# Altium PCB PCB_Smart-Watch-v1.0.PcbDoc (part 1 of 2)
Units mil, origin at the board's own origin, x right, y up, seen from the top; angles counter-clockwise.
Board outline 1007.4 x 787.4 mil, 4 copper layers (Top Layer, Layer 1, Layer 2, Bottom Layer), stack 62.449 mil thick; 64 components, 42 nets, 320 pads, 89 vias.
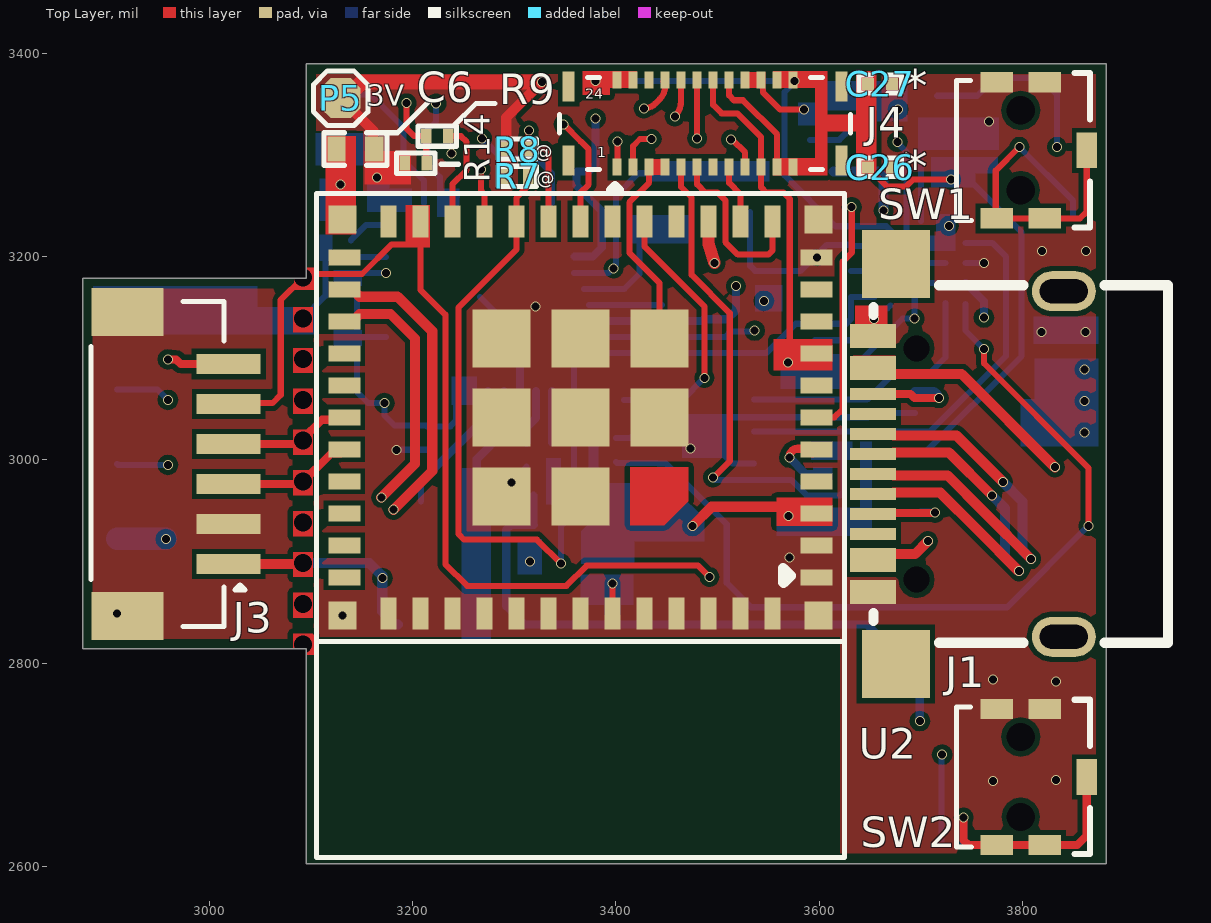
[diagram p0: Top Layer view]
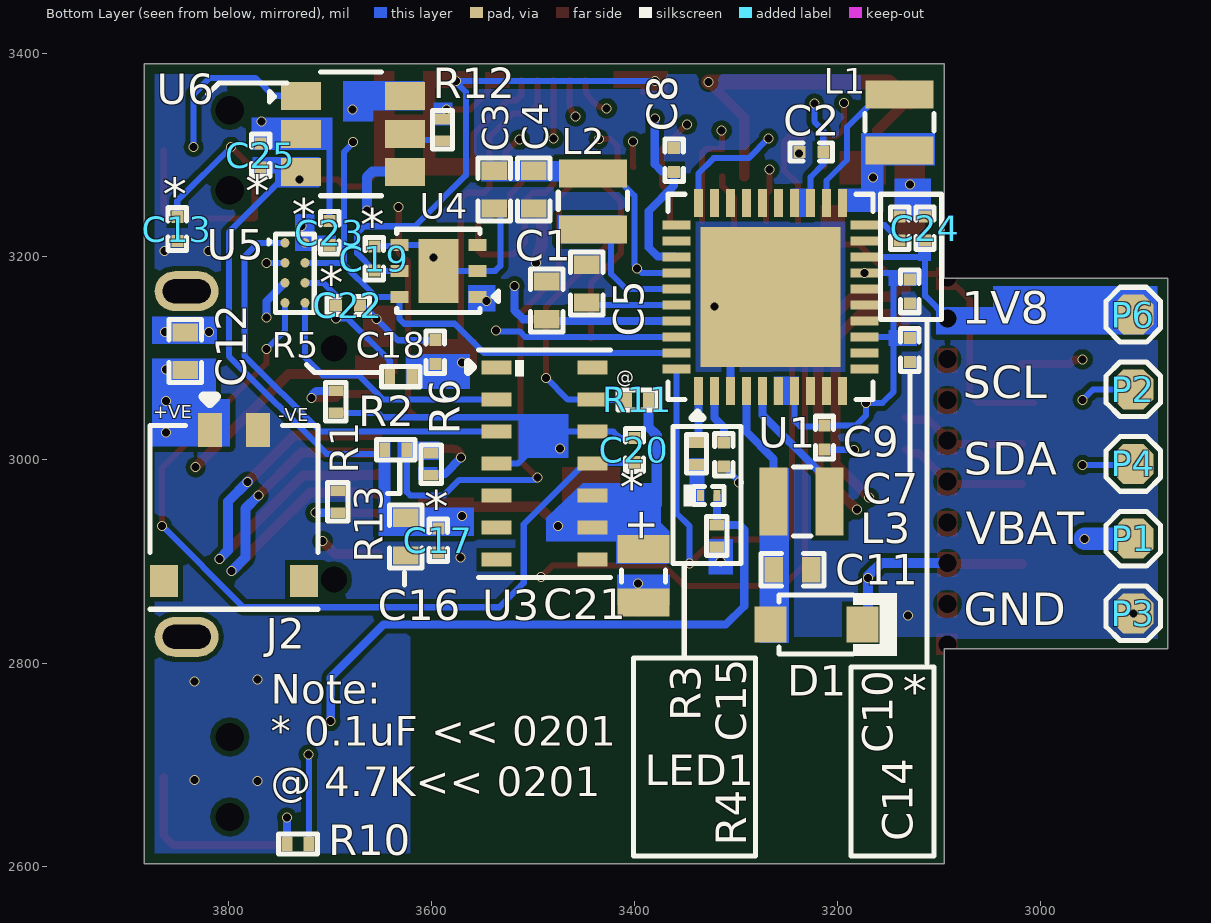
[diagram p1: Bottom Layer view, seen from below]
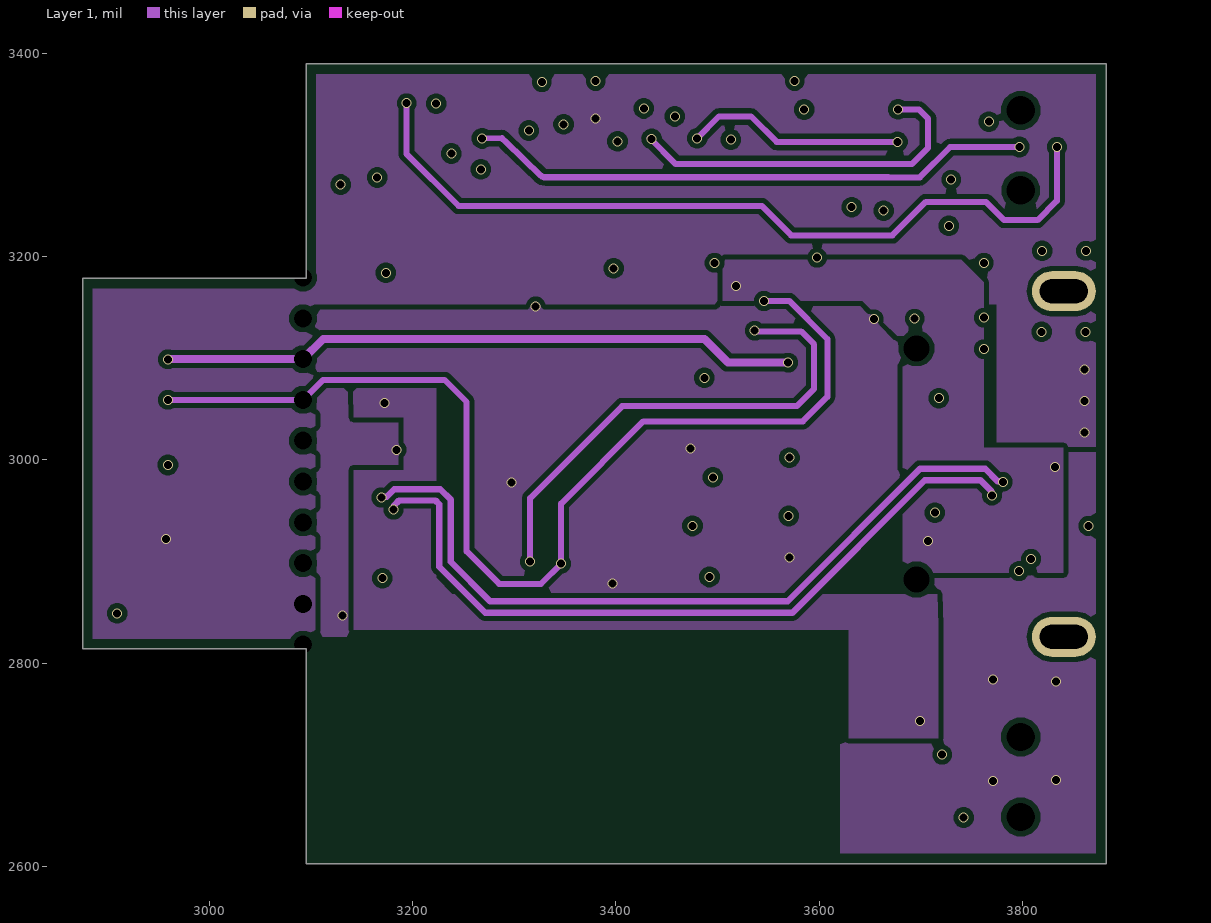
[diagram p2: Layer 1]
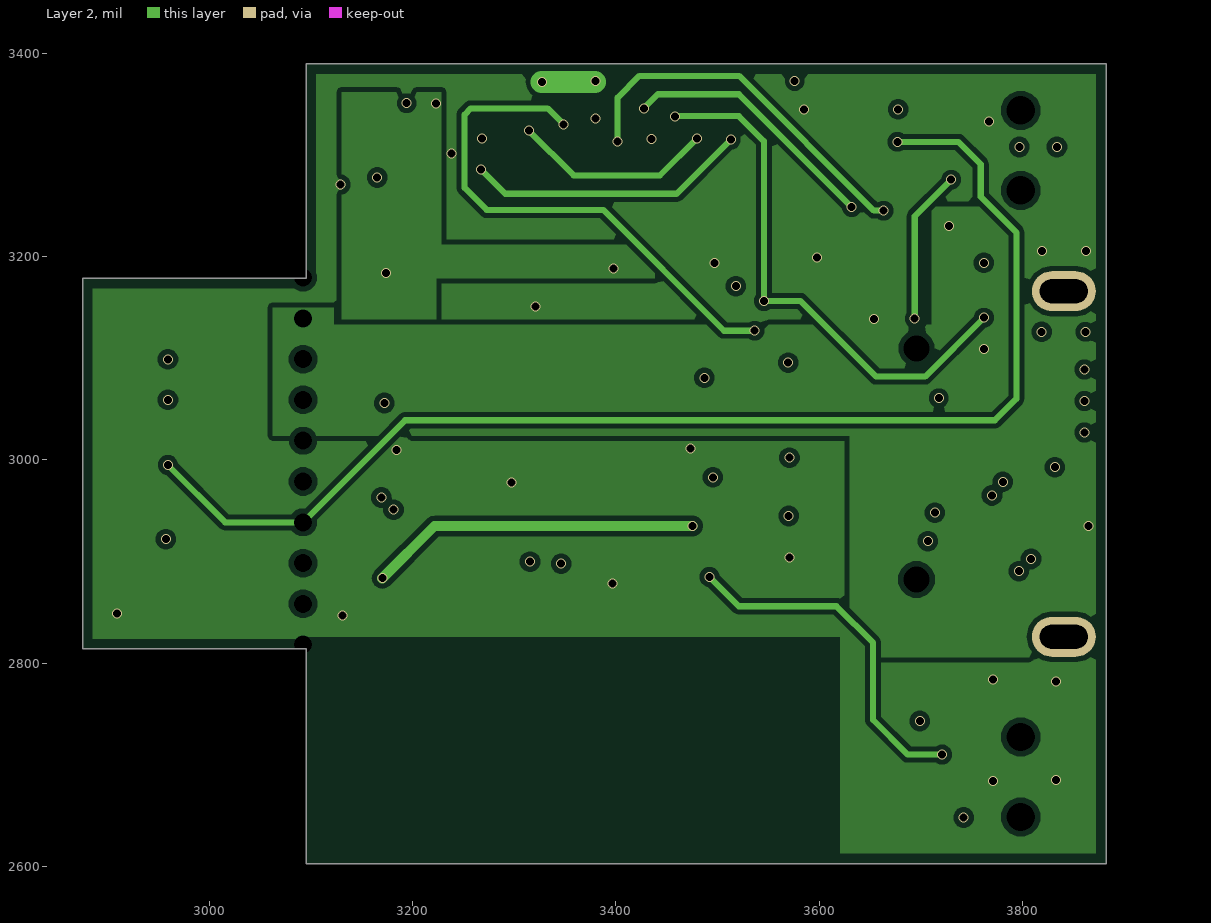
[diagram p3: Layer 2]
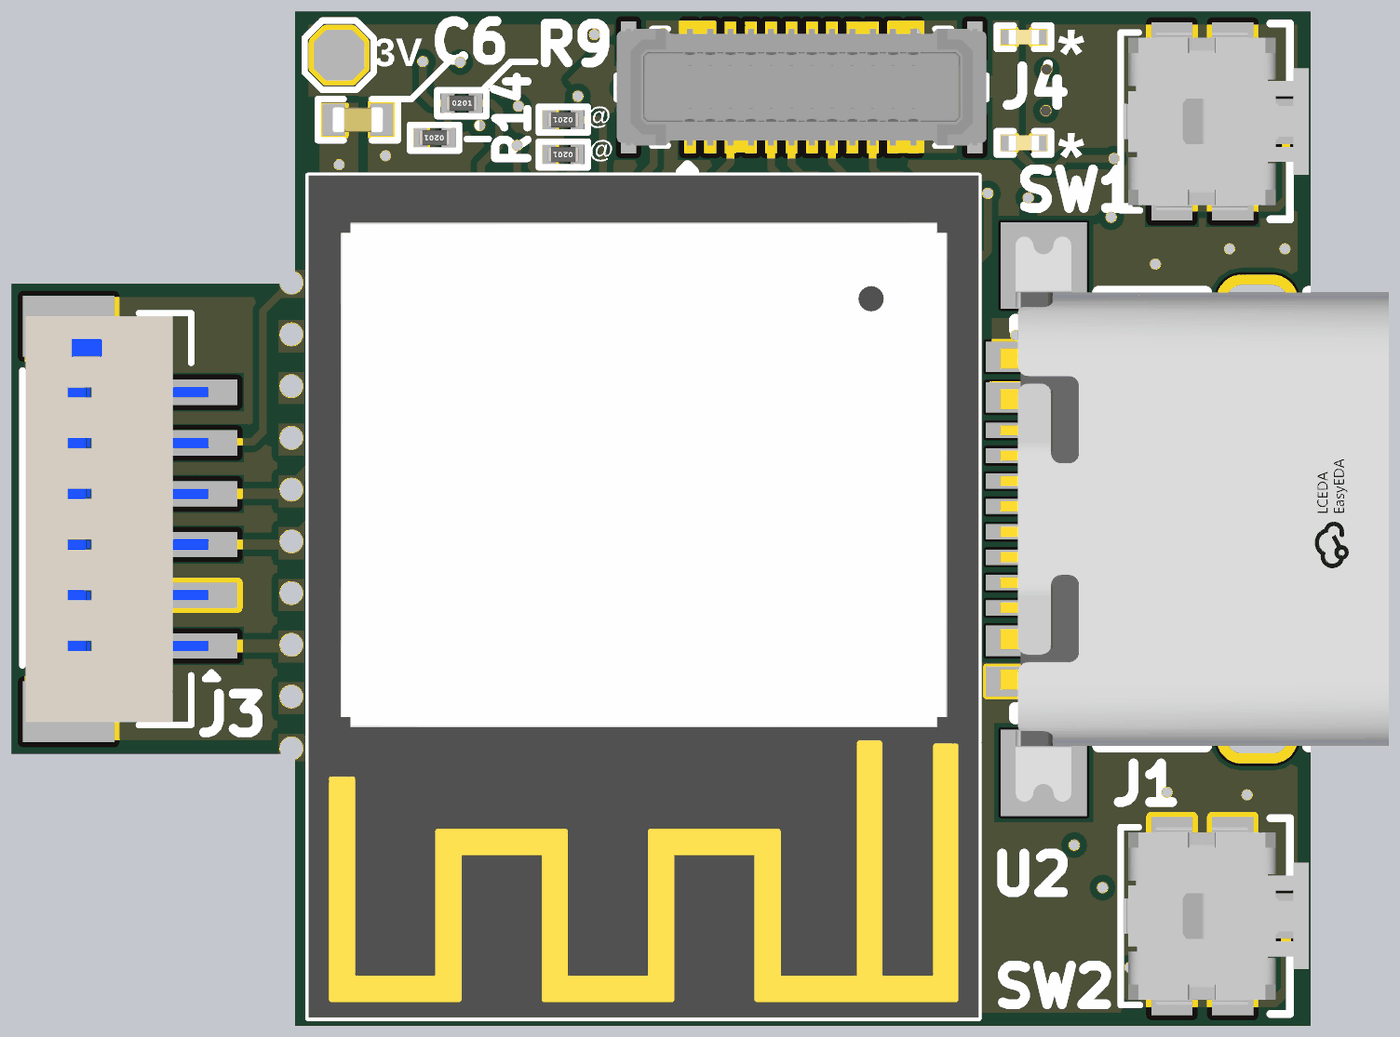
[diagram p5: 3D render of the assembled board from above, using the file's embedded part models]
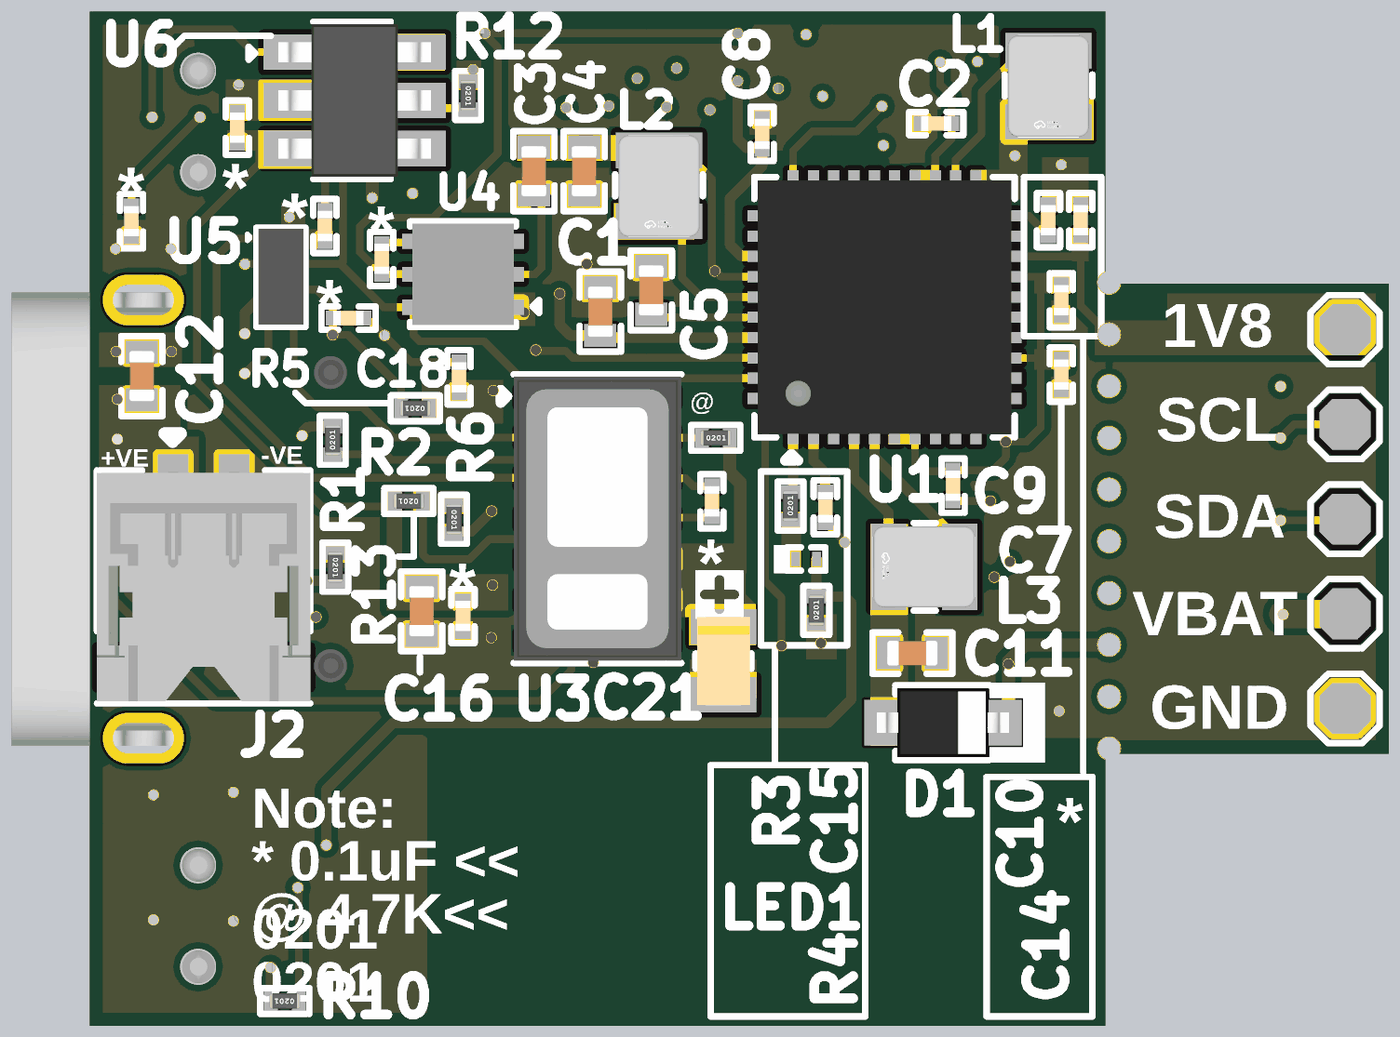
[diagram p6: 3D render of the assembled board from below, using the file's embedded part models]

## Layer stack, top to bottom
Top Solder: solder mask 0.3937, Solder Resist, Dk 3.5
Top Layer: signal copper 1.378
Dielectric 2: prepreg 8.2835, PP-006, Dk 4.1
Layer 1: signal copper 0.5984
Dielectric 1: core 41.9291, FR-4, Dk 4.8
Layer 2: signal copper 0.5984
Dielectric 3: prepreg 8.2835, PP-006, Dk 4.1
Bottom Layer: signal copper 1.378
Bottom Solder: solder mask 0.3937, Solder Resist, Dk 3.5

## Board outline
2875,2814 2875,3178.6 3095,3178.6 3095,3390 3882.4,3390 3882.4,2602.6 3095,2602.6 3095,2814

## Design rules (kind name [scope] priority, off if disabled: settings)
BoardOutlineClearance [All] p1: gap=0 ignorepadtopadclearanceinfootprint=FALSE except(10: Poly-OutlineEdge)
Clearance [All] p1: gap=5 ignorepadtopadclearanceinfootprint=FALSE except(4: Arc-SMDPad Track-SMDPad SMDPad-SMDPad)
DiffPairsRouting [All] p1: maxlimit=7 minlimit=5 mostfreqgap=7 toplayer_mingap=7 toplayer_minwidth=10 toplayer_maxwidth=10 toplayer_prefwidth=10 midlayer1_maxgap=5 midlayer1_prefgap=5 midlayer1_minwidth=6.27 midlayer1_maxwidth=6.27 midlayer1_prefwidth=6.27 midlayer2_maxgap=5 midlayer2_prefgap=5 midlayer2_minwidth=6.27 midlayer2_maxwidth=6.27 midlayer2_prefwidth=6.27 bottomlayer_mingap=7 bottomlayer_minwidth=10 bottomlayer_maxwidth=10 bottomlayer_prefwidth=10 impedanceprofiledriven=TRUE impedanceprofileid={1438CEE1-A6E1-463A-A099-11A46FD6A5DC} impedanceprofilevalue=90.000000 maxuncoupledlength=500
HoleToHoleClearance [All] p1: gap=0 allowstackedmicrovias=TRUE
MatchedLengths "Schematic Matched Net Lengths" [InNetClass('USB_DIFF')] p1: tolerance=20 checknetsindiffpair=TRUE checkdiffpairvsdiffpair=FALSE checkxsignals=FALSE checkothers=FALSE
MaxMinImpedance "Schematic Impedance Constraint" [InNetClass('USB_DIFF')] p1: minimum=85.00 maximum=95.00
MinimumSolderMaskSliver [All] p1: minsoldermaskwidth=0
PolygonConnect [All] p1: connectstyle=Direct reliefconductorwidth=10 reliefentries=4 polygonreliefangle="90 Angle" airgapwidth=10
RoutingVias [All] p1: holewidth=7.87 width=9.84 viastyle="Through Hole" minholewidth=7.87 minwidth=9.84 maxholewidth=7.87 maxwidth=9.84
SilkToSilkClearance [All] p1: silktosilkclearance=0
SilkToSolderMaskClearance [IsPad] p1: minsilkscreentomaskgap=0 clearancetoexposedcopper=TRUE
SolderMaskExpansion SolderMaskExpansion_1 [All] p1: expansion=4 istentingtop=FALSE
Width [All] p1: maxlimit=100 minlimit=6 preferedwidth=22
25 further rules are at their usual default settings.

## Classes and differential pairs
differential pair class USB_DIFF_Lines: USB
net class USB_DIFF: USB_N USB_P
component class U_Sensor-Sheet: C19 C20 C21 C22 C23 R11 U3 U4 U5
component class U_Power-Sheet: C1 C2 C3 C4 C5 C6 C7 C8 C9 C10 C11 C12 C13 C14 C15 C24 D1 J1 J2 L1 L2 L3 LED1 P1 P2 P3 P4 P5 P6 R1 R2 R3 R4 SW1 U1
component class U_Display-Sheet: C25 C26 C27 J4 R12 U6
component class U_Controller-Sheet: C16 C17 C18 J3 R5 R6 R7 R8 R9 R10 R13 R14 SW2 U2
differential pair USB: +USB_P -USB_N

## Components (designator, comment, footprint, x,y, rotation, side; value= is the part's Value field where it differs from the comment)
C1 "10uF" Cap-0402 3486.5,3157 r270 bottom locked
C2 "2.2uF" CAP-0201 3226,3303 r0 bottom locked
C3 "22uF" Cap-0402 3538,3266 r90 bottom locked
C4 "22uF" Cap-0402 3499,3266 r90 bottom locked
C5 "10uF" Cap-0402 3447,3173.5 r90 bottom locked
C6 "22uF" Cap-0402 3143.5,3306 r0 top locked
C7 "2.2uF" CAP-0201 3129,3108.19 r90 bottom locked
C8 "1uF" CAP-0201 3361,3295 r270 bottom locked
C9 "2.2uF" CAP-0201 3213,3022 r270 bottom locked
C10 "2.2uF" CAP-0201 3139,3228 r270 bottom locked
C11 "22uF" Cap-0402 3244.5,2892 r0 bottom locked
C12 "10uF" Cap-0402 3842,3107 r90 bottom locked
C13 "100nF" CAP-0201 3850,3227.19 r270 bottom
C14 "1uF" CAP-0201 3129,3165.81 r90 bottom locked
C15 "2.2uF" CAP-0201 3312,3005.19 r270 bottom locked
C16 "10uF" Cap-0402 3625,2924.5 r90 bottom locked
C17 "100nF" CAP-0201 3593,2920.81 r90 bottom locked
C18 "1uF" CAP-0201 3596,3106 r270 bottom locked
C19 "100nF" CAP-0201 3656,3198 r90 bottom
C20 "100nF" CAP-0201 3400,3009.81 r270 bottom locked
C21 "10uF" Tant-0603 3391,2886 r270 bottom locked
C22 "100nF" CAP-0201 3681.81,3152 r180 bottom locked
C23 "100nF" CAP-0201 3700.01,3223.5 r270 bottom locked
C24 "100nF" CAP-0201 3114,3228 r270 bottom locked
C25 "100nF" CAP-0201 3768,3299.81 r270 bottom locked
C26 "100nF" CAP-0201 3660,3288 r180 top locked
C27 "100nF" CAP-0201 3660,3370 r180 top locked
D1 "B5819WS" SOD-323 3220.72,2838 r0 bottom locked
J1 "TYPEC-312DSS-ACP16" TYPEC-312DSS-ACP16 3747,2996 r90 top locked
J2 "0781710002" 0781710002 3794.1,2955.31 r180 bottom locked
J3 "Voltlink Target" "Voltlink Target" 2969,2996 r90 top locked
J4 "BM20B(0.8)-24DS-0.4V(51)" BM20B(0.8)-24DS-0.4V(51) 3487.63,3331.09 r0 top locked
L1 "1uH" WPN201610M1R0MT 3139,3332 r270 bottom locked
L2 "1uH" WPN201610M1R0MT 3441,3254.56 r270 bottom locked
L3 "1uH" WPN201610M1R0MT 3235.44,2959 r0 bottom locked
LED1 "RED" LED-0201 3326.93,2965 r0 bottom locked
P1 "TEST POINT 0.5mm Dia" "Test-point - 0.5mm" 2909,2922.5 r90 bottom locked
P2 "TEST POINT 0.5mm Dia" "Test-point - 0.5mm" 2909,3069.5 r90 bottom locked
P3 "TEST POINT 0.5mm Dia" "Test-point - 0.5mm" 2909,2849 r90 bottom locked
P4 "TEST POINT 0.5mm Dia" "Test-point - 0.5mm" 2909,2996 r90 bottom locked
P5 "TEST POINT 0.5mm Dia" "Test-point - 0.5mm" 3129,3356 r90 top locked
P6 "TEST POINT 0.5mm Dia" "Test-point - 0.5mm" 2909,3143 r90 bottom locked
R1 "5.1K" Res-0201 3692,2958.83 r270 bottom locked value=5.1kR
R2 "5.1K" Res-0201 3694,3057.17 r90 bottom locked value=5.1kR
R3 "220R" Res-0201 3339,3006.17 r90 bottom locked
R4 "10K" Res-0201 3319,2925.17 r90 bottom locked
R5 "10K" Res-0201 3630,3082 r0 bottom locked
R6 "0R" Res-0201 3600,2995.83 r270 bottom locked
R7 "4.7K" Res-0201 3302.83,3279 r180 top locked
R8 "4.7K" Res-0201 3302.83,3306 r180 top locked
R9 "0R" Res-0201 3224.08,3318.75 r0 top locked
R10 "0R" Res-0201 3731.17,2622 r0 bottom locked
R11 "4.7K" Res-0201 3397,3059 r180 bottom locked
R12 "10K" Res-0201 3589,3324.83 r270 bottom locked
R13 "10K" Res-0201 3635,3010 r0 bottom locked
R14 "10K" Res-0201 3203,3292 r180 top locked
SW1 "R-667799" R-667799 3819.05,3304.63 r270 top locked
SW2 "R-667799" R-667799 3819.05,2687.93 r270 top locked
U1 "AXP2101" "40-QFN (5mm×5mm)" 3266.12,3160.48 r90 bottom locked
U2 "ESP32-C3-MINI-1-H4" ESP32-C3-MINI-1-H4 3364.98,3041.91 r180 top locked
U3 "MAX30102EFD+T" MAX30102EFD+T 3488.7,2996.3 r180 bottom locked
U4 "TMP117AIDRVT" WSON-6(2x2) 3593,3186 r0 bottom locked
U5 "TXS0102YZPR" 8-DSBGA 3734.16,3184.16 r180 bottom locked
U6 "FAN5622SX" SuperSOT-6 3677,3321 r180 bottom locked

## Footprints (in the part's own frame and the unit in brackets; to place one, negate y for a bottom-side part, rotate by r counter-clockwise, add the part's x,y. Pads: shape width x height; smd on the part's side, far side on the other; paste and mask are expansions set on the pad)
8-DSBGA [mm]
  round 0.23 smd mask+0.05: A1(-0.25,0.75) A2(0.25,0.75) B1(-0.25,0.25) B2(0.25,0.25) C1(-0.25,-0.25) C2(0.25,-0.25) D1(-0.25,-0.75) D2(0.25,-0.75)
  silkscreen extent -0.66,-0.99 0.48,0.97, body extent -0.44,-0.94 0.44,0.94, height 0.5
"40-QFN (5mm×5mm)" [mm]
  rect 0.7x0.22 smd: 1(-2.35,1.8) 2(-2.35,1.4) 3(-2.35,1) 4(-2.35,0.6) 5(-2.35,0.2) 6(-2.35,-0.2) 7(-2.35,-0.6) 8(-2.35,-1) 9(-2.35,-1.4) 10(-2.35,-1.8) 21(2.35,-1.8) 22(2.35,-1.4) 23(2.35,-1) 24(2.35,-0.6) 25(2.35,-0.2) 26(2.35,0.2) 27(2.35,0.6) 28(2.35,1) 29(2.35,1.4) 30(2.35,1.8)
  rect 0.22x0.7 smd: 11(-1.8,-2.35) 12(-1.4,-2.35) 13(-1,-2.35) 14(-0.6,-2.35) 15(-0.2,-2.35) 16(0.2,-2.35) 17(0.6,-2.35) 18(1,-2.35) 19(1.4,-2.35) 20(1.8,-2.35) 31(1.8,2.35) 32(1.4,2.35) 33(1,2.35) 34(0.6,2.35) 35(0.2,2.35) 36(-0.2,2.35) 37(-0.6,2.35) 38(-1,2.35) 39(-1.4,2.35) 40(-1.8,2.35)
  rect 3.5x3.5 smd: 41(0,0)
  silkscreen extent -3.02,-2.57 2.57,2.57, body extent -2.51,-2.51 2.51,2.51, height 0.61
0781710002 [mm]
  rect 0.6x0.85 smd: 1(-0.6,1.887) 2(0.6,1.887)
  rect 0.7x0.8 smd: S1(-1.75,-1.887) S2(1.75,-1.887)
  silkscreen extent -2.1,-2.6 2.1,2.72, body extent -2.1,-2.55 2.1,1.98, height 1.42
BM20B(0.8)-24DS-0.4V(51) [mm]
  rect 0.23x0.42 smd paste-1: 1(-2.2,-1.09) 2(-1.8,-1.09) 3(-1.4,-1.09) 4(-1,-1.09) 5(-0.6,-1.09) 6(-0.2,-1.09) 7(0.2,-1.09) 8(0.6,-1.09) 9(1,-1.09) 10(1.4,-1.09) 11(1.8,-1.09) 12(2.2,-1.09) 13(2.2,1.09) 14(1.8,1.09) 15(1.4,1.09) 16(1,1.09) 17(0.6,1.09) 18(0.2,1.09) 19(-0.2,1.09) 20(-0.6,1.09) 21(-1,1.09) 22(-1.4,1.09) 23(-1.8,1.09) 24(-2.2,1.09)
  rect 0.3x0.75 smd: S1(3.41,-0.925) S2(3.41,0.925) S3(-3.41,-0.925) S4(-3.41,0.925)
  silkscreen extent -3.64,-1.66 3.64,1.15, body extent -3.64,-1.14 3.64,1.16, height 0.76
CAP-0201 [mm]
  rect 0.3x0.3 smd mask+0.055: 1(-0.3,0) 2(0.3,0)
  silkscreen extent -0.53,-0.23 0.53,0.23, body extent -0.3,-0.15 0.3,0.15, height 0.28
Cap-0402 [mil]
  rect 18x25 smd mask+2.36: 1(-18.5,0) 2(18.5,0)
  silkscreen extent -31,-16 31,16, body extent -20,-10 20,10, height 19
ESP32-C3-MINI-1-H4 [mm]
  rect 0.8x0.4 smd: 1(-5.9,4) 2(-5.9,3.2) 3(-5.9,2.4) 4(-5.9,1.6) 5(-5.9,0.8) 6(-5.9,0) 7(-5.9,-0.8) 8(-5.9,-1.6) 9(-5.9,-2.4) 10(-5.9,-3.2) 11(-5.9,-4) 25(5.9,-4) 26(5.9,-3.2) 27(5.9,-2.4) 28(5.9,-1.6) 29(5.9,-0.8) 30(5.9,0) 31(5.9,0.8) 32(5.9,1.6) 33(5.9,2.4) 34(5.9,3.2) 35(5.9,4)
  rect 0.4x0.8 smd: 12(-4.8,-4.9) 13(-4,-4.9) 14(-3.2,-4.9) 15(-2.4,-4.9) 16(-1.6,-4.9) 17(-0.8,-4.9) 18(0,-4.9) 19(0.8,-4.9) 20(1.6,-4.9) 21(2.4,-4.9) 22(3.2,-4.9) 23(4,-4.9) 24(4.8,-4.9) 36(4.8,4.9) 37(4,4.9) 38(3.2,4.9) 39(2.4,4.9) 40(1.6,4.9) 41(0.8,4.9) 42(0,4.9) 43(-0.8,4.9) 44(-1.6,4.9) 45(-2.4,4.9) 46(-3.2,4.9) 47(-4,4.9) 48(-4.8,4.9)
  rect 1.45x1.45 smd: 49(-1.975,0) 49(-1.975,-1.975) 49(0,1.975) 49(0,0) 49(0,-1.975) 49(1.975,1.975) 49(1.975,0) 49(1.975,-1.975)
  rect 0.7x0.7 smd: 50(5.95,4.95) 51(5.95,-4.95) 52(-5.95,-4.95) 53(-5.95,4.95)
  Top Layer region: -2.7,2.1 -2.1,2.7 -1.25,2.7 -1.25,1.25 -2.7,1.25
  silkscreen extent -6.6,-5.6 6.6,11, body extent -6.6,-5.61 6.6,10.99, height 2.4
LED-0201 [mm]
  rect 0.17x0.28 smd mask+0.05: 1(-0.205,0) 2(0.205,0)
  silkscreen extent -0.38,-0.28 0.64,0.28
MAX30102EFD+T [mm]
  rect 0.75x0.35 smd: 1(-1.2,2.4) 2(-1.2,1.6) 3(-1.2,0.8) 4(-1.2,0) 5(-1.2,-0.8) 6(-1.2,-1.6) 7(-1.2,-2.4) 8(1.2,-2.4) 9(1.2,-1.6) 10(1.2,-0.8) 11(1.2,0) 12(1.2,0.8) 13(1.2,1.6) 14(1.2,2.4)
  silkscreen extent -1.9,-2.84 1.65,2.84, body extent -1.65,-2.8 1.65,2.8, height 1.65
R-667799 [mm]
  round 0 hole 0.711 unplated: 6(-1,-0.525) 7(1,-0.525)
  rect 0.508x0.813 smd: A(-1.7,-1.125) B(1.7,0.075) B(1.7,-1.125) G(-1.7,0.075)
  rect 0.889x0.508 smd: B(0,1.125)
  silkscreen extent -1.93,-2.13 1.93,1.2, body extent -1.75,-2.08 1.75,1.57, height 1
Res-0201 [mm]
  rect 0.27x0.37 smd mask+0.055: 1(-0.275,0) 2(0.275,0)
  silkscreen extent -0.48,-0.25 0.48,0.25, body extent -0.3,-0.15 0.3,0.15, height 0.29
SOD-323 [mm]
  rect 0.8x0.9 smd mask+0.055: 1(-1.15,0) 2(1.15,0)
  silkscreen extent -2.01,-0.79 0.94,0.79, body extent -1.3,-0.67 1.3,0.67, height 1.1
SuperSOT-6 [mm]
  rect 1x0.7 smd: 1(-1.3,0.95) 2(-1.3,0) 3(-1.3,-0.95) 4(1.3,-0.95) 5(1.3,0) 6(1.3,0.95)
  silkscreen extent -2.09,-1.55 0.71,1.55, body extent -1.5,-1.5 1.5,1.5, height 1.05
Tant-0603 [mm]
  rect 0.7x1.3 smd: 1(-0.67,0) 2(0.67,0)
  silkscreen extent -0.15,-0.55 0.15,0.55, body extent -0.88,-0.52 0.88,0.52, height 0.89
"Test-point - 0.5mm" [mm]
  oct 1x1 smd: 1(0,0)
  silkscreen extent -0.68,-0.68 0.68,0.68
TYPEC-312DSS-ACP16 [mm]
  rect 1.7x1.7 smd paste+0 mask+0.05: 25(5,1.817) 28(-5,1.817)
  oval 1x1.6 hole 0.6 slot 1.2 at 90 deg paste+0 mask+0.05: 26(4.32,-2.383) 27(-4.32,-2.383)
  rect 0.3x1.15 smd paste+0 mask+0.05: A1(-3.35,2.383) A4(-2.55,2.383) A5(-1.25,2.383) A6(-0.25,2.383) A7(0.25,2.383) A8(1.25,2.383) A9(2.55,2.383) A12(3.35,2.383) B1(3.05,2.383) B4(2.25,2.383) B5(1.75,2.383) B6(0.75,2.383) B7(-0.75,2.383) B8(-1.75,2.383) B9(-2.25,2.383) B12(-3.05,2.383)
  round 0 hole 0.65 unplated paste+0: ""(-2.89,1.302) ""(2.89,1.302)
  silkscreen extent -4.47,-4.98 4.47,2.37, body extent -5.57,-4.98 5.57,2.67, height 3.26
"Voltlink Target" [mm]
  rect 0.5x1.6 smd: 1(-2.5,-1.262) 2(-1.5,-1.262) 3(-0.5,-1.262) 4(0.5,-1.262) 5(1.5,-1.262) 6(2.5,-1.262)
  rect 1.2x1.8 smd: MP1(-3.8,1.262) MP2(3.8,1.262)
  silkscreen extent -4.06,-1.68 4.06,2.17, body extent -4,-1.49 4,2.11, height 4.25
WPN201610M1R0MT [mm]
  rect 0.7x1.7 smd: 1(-0.7,0) 2(0.7,0)
  silkscreen extent -0.23,-0.86 0.2,0.86, body extent -1.01,-0.8 1.01,0.8, height 1.12
WSON-6(2x2) [mm]
  rect 0.45x0.3 smd: 1(-0.975,0.65) 2(-0.975,0) 3(-0.975,-0.65) 4(0.975,-0.65) 5(0.975,0) 6(0.975,0.65)
  rect 1x1.6 smd: 7(0,0)
  silkscreen extent -1.5,-1.04 1.04,1.04, body extent -1,-1 1,1, height 0.69

## Part data
C1 C5 C12 C16: library part CC0402MRX5R6BB106, "CAP CER 10UF 10V X5R 0402", Case Code (Imperial)=0402, Case Code (Metric)=1005, LCSC Part Number=C962143, Manufacturer=Yageo, Max Operating Temperature=85°C, Min Operating Temperature=-55°C, Supplier Part Number 1=6097631, Tolerance=20%, Voltage Rating=10V, Capacitance=10uF, Case/Package=0402, Category="Ceramic Capacitors", ComponentLink1Description=http://www.yageo.com/documents/recent/UPY-GPHC_X5R_4V-to-50V_25.pdf?src-supplier=Digi-Key, ComponentLink1URL=http://www.yageo.com/documents/recent/UPY-GPHC_X5R_4V-to-50V_25.pdf?src-supplier=Digi-Key, Item Type=Capacitor, Manufacturer Part Number=CC0402MRX5R6BB106, Mount="Surface Mount", Packaging="Tape and Reel", Pricing 1="10000=0.02650, 20000=0.02590, 30000=0.02550, 40000=0.02530, 50000=0.02450 (USD)", RoHS=Yes, RoHS Compliant=Yes, Stock 1=80000, Supplier 1="Future Electronics"
C2 C7 C9 C10 C15: library part CC0201MRX5R6BB225, "CAP CER 2.2UF 10V X5R 0201", Case/Package=0201, LCSC Part Number=C2186869, Manufacturer=Yageo, Max Operating Temperature=85°C, Min Operating Temperature=-55°C, Supplier Part Number=603-CC0201MRX56BB225, Tolerance=20%, Voltage Rating=10V, Category="Ceramic Capacitors", ComponentLink1Description=https://www.yageo.com/upload/media/product/productsearch/datasheet/mlcc/UPY-GPHC_X5R_4V-to-50V_26.pdf?src-supplier=Digi-Key, ComponentLink1URL=https://www.yageo.com/upload/media/product/productsearch/datasheet/mlcc/UPY-GPHC_X5R_4V-to-50V_26.pdf?src-supplier=Digi-Key, Item Type=Capacitor, Manufacturer Part Number=CC0201MRX5R6BB225, Mounting Technology="Surface Mount", Packaging="Tape and Reel", Pricing="1=0.43, 10=0.294, 50=0.294, 100=0.176, 1000=0.112, 10000=0.091 (USD)", RoHS=Yes, RoHS Compliant=Yes, Series=CC, Stock=25553, Supplier=Mouser
C3 C4 C6 C11: library part GRM158R61A226ME15D, "CAP CER 22UF 10V X5R 0402", Case/Package=343Case, Dielectric=1537DielectricType, Max Operating Temperature=85°C, Min Operating Temperature=-55°C, Supplier Part Number=490-GRM158R61A226ME15DCT-ND, Tolerance=20%, Voltage Rating=10V, Category="Ceramic Capacitors", Height=800um, Item Type=Capacitor, Length=1mm, Material=4241ConductorMaterial, Pricing="1=0.45, 10=0.299, 50=0.2202, 100=0.1794, 500=0.1416, 1000=0.11957, 2500=0.11328 (USD)", RoHS=Yes, Stock=26634, Supplier=Digi-Key, Thickness=800um, Voltage Rating (DC)=10V, Width=500um
C8 C14 C18: library part CC0201MRX5R7BB105, "CAP CER 1UF 16V X5R 0201", LCSC Part Number=C5182464, Manufacturer=Yageo, Supplier Part Number=13-CC0201MRX5R7BB105TR-ND, Category="Ceramic Capacitors", Item Type=Capacitor, Manufacturer Part Number=CC0201MRX5R7BB105, RoHS=Yes, Supplier=Digi-Key
C13 C17 C19 C20 C22 C23 C24 C25 C26 C27: library part CC0201KRX5R6BB104, "CAP CER 0.1UF 10V X5R 0201", Case Code (Imperial)=0201, Case Code (Metric)=0603, Dielectric=X5R, LCSC Part Number=C190183, Manufacturer=Yageo, Max Operating Temperature=85°C, Min Operating Temperature=-55°C, Resistor Type=Ceramic, Supplier Part Number 1=603-CC201KRX5R6BB104, Tolerance=10%, Voltage Rating=10V, Capacitance=100nF, Case/Package=0201, Category="Ceramic Capacitors", ComponentLink1Description=https://datasheet.ciiva.com/11587/upy-gphc-x5r-4v-to-50v-12-11587190.pdf?src-supplier=Avnet, ComponentLink1URL=https://datasheet.ciiva.com/11587/upy-gphc-x5r-4v-to-50v-12-11587190.pdf?src-supplier=Avnet, Construction=Flat, Depth=0.3mm, Halogen Free="Halogen Free", Height=0.3mm, Lead Free="Lead Free", Length=0.6mm, Manufacturer Part Number=CC0201KRX5R6BB104, Mount="Surface Mount", Packaging="Tape and Reel", Pricing 1="1=0.10000, 10=0.02400, 50=0.02400, 100=0.01900, 1000=0.01100, 10000=0.00900 (USD)", Radiation Hardening=No, RoHS=Yes, RoHS Compliant=Yes, Series=CC, Stock 1=824403, Supplier 1=Mouser, Termination=SMD/SMT, Thickness=0.013inch, Voltage Rating (DC)=10V, Weight=6E-06oz, Width=0.012inch
C21: library part T58MM106M6R3C0300, "CAP TANT POLY 10UF 6.3V 0603", Case Code (Imperial)=0603, Case Code (Metric)=1608, ESR (Equivalent Series Resistance)=300mR, LCSC Part Number=C2158420, Manufacturer=Vishay, Max Operating Temperature=105°C, Min Operating Temperature=-55°C, Supplier Part Number=718-2111-1-ND, Tolerance=20%, Voltage Rating=6.3V, Case/Package=0603, Category="Tantalum Capacitors", ComponentLink1Description=http://www.farnell.com/datasheets/2699706.pdf?src-supplier=Farnell, ComponentLink1URL=http://www.farnell.com/datasheets/2699706.pdf?src-supplier=Farnell, ComponentLink2Description=http://www.vishay.com/docs/40189/t58.pdf?src-supplier=Avnet, ComponentLink2URL=http://www.vishay.com/docs/40189/t58.pdf?src-supplier=Avnet, ComponentLink3Description=http://www.farnell.com/datasheets/2028130.pdf?src-supplier=Element14, ComponentLink3URL=http://www.farnell.com/datasheets/2028130.pdf?src-supplier=Element14, ComponentLink4Description=http://www.vishay.com/docs/40189/t58.pdf?src-supplier=Digi-Key, ComponentLink4URL=http://www.vishay.com/docs/40189/t58.pdf?src-supplier=Digi-Key, Construction=Flat, Depth=0.85mm, Features="General Purpose", Item Type=Capacitor, Length=1.6mm, Manufacturer Part Number=T58MM106M6R3C0300, Mounting Technology="Surface Mount", Packaging="Cut Tape", Pricing="1=0.69, 10=0.462, 50=0.3676, 100=0.3035, 500=0.23714, 1000=0.20158 (USD)", Reach SVHC Compliant=Unknown, RoHS=Yes, RoHS Compliant=Yes, Series="vPolyTan™ T58", Stock=738, Supplier=Digi-Key, Voltage Rating (DC)=6.3V
D1: "DIODE SCHOTTKY 40V 1A SOD323", Average Rectified Current=1A, Forward Voltage=900mV, LCSC Part Number=C22624, Manufacturer=MDD, Manufacturer Part Number=B5819WS-TP, Max Operating Temperature=125°C, Max Reverse Leakage Current=1mA, Max Reverse Voltage (DC)=40V, Max Surge Current=10A, Min Operating Temperature=-65°C, Package Quantity=1, Category="Rectifier Diodes", ComponentLink1Description=LCSC, ComponentLink1URL=https://lcsc.com/product-detail/Schottky-Barrier-Diodes-SBD_MDD-Microdiode-Electronics-B5819WS_C64886.html, Element Configuration=Single, Item Type=Diode, Lead Free="Lead Free", Mount="Surface Mount", Number of Pins=2, Packaging="Tape and Reel", Peak Non-Repetitive Surge Current=10A, Pricing 1="1=0.34370, 10=0.18990, 25=0.18810, 100=0.11820, 250=0.11700, 500=0.08890, 1000=0.07420 (USD)", Radiation Hardening=No, RoHS=Yes, RoHS Compliant=Yes, Series=-, Stock 1=1701, Supplier 1="Arrow Electronics", Supplier Part Number 1=B5819WS-TP
J1: "USB 3.1 5A 1 260℃ Surface Mount 16P Female -45℃~+85℃ Type-C SMD USB Connectors ROHS", LCSC Part Number=C2909601, Manufacturer=XUNPU, Package=Custom, ComponentLink1Description=LCSC, ComponentLink1URL=https://www.lcsc.com/product-detail/USB-Connectors_XUNPU-TYPEC-312DSS-ACP16_C2909601.html, Item Type="Type-C SMD USB", Manufacturer Part Number=TYPEC-312DSS-ACP16
J2: "CONN HEADER SMD 2POS 1.2MM", Contact Resistance=20mR, Housing Color=Black, LCSC Part Number=C505023, Manufacturer=Molex, Max Operating Temperature=85°C, Max Voltage Rating (AC)=50V, Min Operating Temperature=-25°C, Package=Custom, Supplier Part Number=538-78171-0002, ComponentLink1Description=LCSC, ComponentLink1URL=https://www.lcsc.com/product-detail/Wire-To-Board-Wire-To-Wire-Connector_MOLEX-781710002_C505023.html, Contact Material="Copper Alloy", Contact Plating=Gold, Depth=4.5mm, Housing Material=Polymer, Item Type="To Board / Wire To Wire Connector", Length=4.2mm, Manufacturer Part Number=0781710002, Number of Contacts=2, Number of Rows=1, Orientation=Straight, Packaging="Tape and Reel", Pitch=1.2mm, Pricing="1=0.39, 10=0.313, 50=0.313, 100=0.228, 1000=0.181, 10000=0.141 (USD)", Radiation Hardening=No, RoHS=Yes, RoHS Compliant=Yes, Stock=82070, Supplier=Mouser, Termination=Solder
J3: library part C145963, "1x6P SH 1 1mm 6 SMD,P=1mm Wire To Board / Wire To Wire Connector ROHS", Manufacturer=BOOMELE, Package=SMD,P=1mm, ComponentLink1Description=LCSC, ComponentLink1URL=https://www.lcsc.com/product-detail/Wire-To-Board-Wire-To-Wire-Connector_BOOMELE-Boom-Precision-Elec-C145963_C145963.html, Item Type=Connector, LCSC Part Number=C145963, Manufacturer Part Number=C145963
J4: "CONN RCPT 24POS SMD GOLD", LCSC Part Number=C424537, Manufacturer="Hirose Electric Co Ltd", Package=Custom, Supplier Part Number=26-BM20B(0.8)-24DS-0.4V(51)CT-ND, Category=Connectors, ComponentLink1Description=LCSC, ComponentLink2Description=https://datasheet.ciiva.com/24244/en-bm20-20130409-270407-24244272.pdf?src-supplier=Mouser, ComponentLink2URL=https://datasheet.ciiva.com/24244/en-bm20-20130409-270407-24244272.pdf?src-supplier=Mouser, Item Type="Connectors (Board to Board)", Manufacturer Part Number=BM20B(0.8)-24DS-0.4V(51), Pricing="1=1.32, 10=1.114, 25=1.068, 50=1.0454, 100=0.9999, 250=0.909, 500=0.8181, 1000=0.7272, 2500=0.65902 (USD)", RoHS=Yes, Stock=5402, Supplier=Digi-Key
L1 L2 L3: library part WPN201610M1R0MT, "2.05A 1uH ±20% 3.35A 0806 Power Inductors ROHS", LCSC Part Number=C97010, Manufacturer=Sunlord, Supplier Part Number=3442-WPN201610M1R0MTTR-ND, Item Type=Inductor, Manufacturer Part Number=WPN201610M1R0MT, Pricing="2000=0.17776 (USD)", RoHS=Yes, RoHS Compliant=Yes, Supplier=Digi-Key
LED1: library part XL-0201SURC, "40mcd~75mcd 透明透镜 620nm~630nm -30℃~+85℃ Positive post Red 120° 55mW 0201 Light Emitting Diodes (LED) ROHS", LCSC Part Number=C3646923, Manufacturer=XINGLIGHT, Package=0201, ComponentLink1Description=LCSC, ComponentLink1URL=https://www.lcsc.com/product-detail/Light-Emitting-Diodes-LED_XINGLIGHT-XL-0201SURC_C3646923.html, Item Type=LED, Manufacturer Part Number=XL-0201SURC
P1 P2 P3 P4 P5 P6: "Test Point ON", Item Type="Test Point"
R1 R2: library part RC0201FR-075K1L, "RES 5.1K OHM 1% 1/20W 0201", Case Code (Imperial)=0201, Case Code (Metric)=0603, LCSC Part Number=C274341, Manufacturer=Yageo, Max Operating Temperature=125°C, Max Power Dissipation=50mW, Min Operating Temperature=-55°C, Supplier Part Number=9072847, Temperature Coefficient=200ppm/°C, Tolerance=1%, Voltage Rating=25V, Case/Package=0201, Category="Chip SMD Resistors", ComponentLink1Description=http://www.mouser.com/ds/2/447/RC0201-559633.pdf?src-supplier=Mouser, ComponentLink1URL=http://www.mouser.com/ds/2/447/RC0201-559633.pdf?src-supplier=Mouser, ComponentLink2Description=https://datasheet.octopart.com/RC0201FR-075K1L-Yageo-datasheet-164759695.pdf?src-supplier=Future+Electronics, ComponentLink2URL=https://datasheet.octopart.com/RC0201FR-075K1L-Yageo-datasheet-164759695.pdf?src-supplier=Future+Electronics, ComponentLink3Description=http://www.yageo.com/documents/recent/PYu-RC_Group_51_RoHS_L_10.pdf?src-supplier=Digi-Key, ComponentLink3URL=http://www.yageo.com/documents/recent/PYu-RC_Group_51_RoHS_L_10.pdf?src-supplier=Digi-Key, Features="Moisture Resistant", Height=0.23mm, Item Type=Resistor, Lead Free="Lead Free", Length=0.6mm, Manufacturer Part Number=RC0201FR-075K1L, Number of Terminations=2, Packaging="Tape and Reel", Power Rating=50mW, Pricing="10000=0.0014, 40000=0.0013, 200000=0.0013, 400000=0.0012, 1250000=0.0011 (USD)", RoHS=Yes, RoHS Compliant=Yes, Series=RC, Stock=280000, Supplier="Future Electronics", Termination=SMD/SMT, Width=0.3mm
R3: library part RC0201FR-07220RL, "RES 220 OHM 1% 1/20W 0201", Case Code (Imperial)=0201, Case Code (Metric)=0603, LCSC Part Number=C274342, Manufacturer=Yageo, Max Operating Temperature=125°C, Max Power Dissipation=50mW, Min Operating Temperature=-55°C, Resistor Type="Thick Film", Supplier Part Number 1=YAG2509CT-ND, Temperature Coefficient=200ppm/°C, Tolerance=1%, Voltage Rating=25V, Case/Package=0201, Category="Chip SMD Resistors", ComponentLink1Description=https://datasheet.ciiva.com/7672/1563626-7672213.pdf?src-supplier=Element14, ComponentLink1URL=https://datasheet.ciiva.com/7672/1563626-7672213.pdf?src-supplier=Element14, ComponentLink2Description=https://datasheet.ciiva.com/8886/pyu-rc0201-51-rohs-l-8-8886758.pdf?src-supplier=Avnet, ComponentLink2URL=https://datasheet.ciiva.com/8886/pyu-rc0201-51-rohs-l-8-8886758.pdf?src-supplier=Avnet, ComponentLink3Description=https://datasheet.ciiva.com/16855/pyu-rc0201-51-rohs-l-8-16855847.pdf?src-supplier=Avnet+Europe, ComponentLink3URL=https://datasheet.ciiva.com/16855/pyu-rc0201-51-rohs-l-8-16855847.pdf?src-supplier=Avnet+Europe, ComponentLink4Description=https://datasheet.ciiva.com/28393/pyu-rc0201-51-rohs-l-8-28393063.pdf?src-supplier=Avnet+Europe, ComponentLink4URL=https://datasheet.ciiva.com/28393/pyu-rc0201-51-rohs-l-8-28393063.pdf?src-supplier=Avnet+Europe, Contact Plating=Tin,Matte, Depth=0.3mm, Features="Moisture Resistant", Height=0.01inch, Length=0.6mm, Manufacturer Part Number=RC0201FR-07220RL, Military Standard=Not, Number of Terminations=2, Packaging="Tape and Reel", Power Rating=50mW, Pricing 1="1=0.10000, 10=0.03600, 100=0.01480, 1000=0.00665, 2500=0.00577, 5000=0.00477 (USD)", Radiation Hardening=No, REACH SVHC=Unknown, Resistance=220R, RoHS=Yes, Stock 1=189347, Supplier 1=Digi-Key, Termination=SMD/SMT, Width=0.012inch
R4 R5 R12 R13 R14: library part RC0201FR-0710KL, "RES SMD 10K OHM 1% 1/20W 0201", LCSC Part Number=C106225, Manufacturer=Yageo, Package=0201, ComponentLink7Description=LCSC, ComponentLink7URL=https://www.lcsc.com/product-detail/Chip-Resistor-Surface-Mount_YAGEO-RC0201FR-0710KL_C106225.html, Item Type=Resistor, Manufacturer Part Number=RC0201FR-0710KL
R6 R9 R10: library part RC0201JR-070RL, "RES SMD 0 OHM JUMPER 1/20W 0201", Case Code (Imperial)=0201, Case Code (Metric)=0603, LCSC Part Number=C106228, Manufacturer=Yageo, Max Operating Temperature=125°C, Max Power Dissipation=50mW, Min Operating Temperature=-55°C, Package Quantity=10000, Resistance Tolerance=5%, Resistor Type="Thick Film", Supplier Part Number 1=311-0.0NCT-ND, Voltage Rating=25V, Case/Package=0201, Category="Chip SMD Resistors", ComponentLink1Description=https://datasheet.ciiva.com/7672/1563626-7672247.pdf?src-supplier=Element14, ComponentLink1URL=https://datasheet.ciiva.com/7672/1563626-7672247.pdf?src-supplier=Element14, ComponentLink2Description=https://datasheet.ciiva.com/7660/1421516-7660808.pdf?src-supplier=Element14, ComponentLink2URL=https://datasheet.ciiva.com/7660/1421516-7660808.pdf?src-supplier=Element14, ComponentLink3Description=https://datasheet.ciiva.com/7672/1563626-7672248.pdf?src-supplier=Element14, ComponentLink3URL=https://datasheet.ciiva.com/7672/1563626-7672248.pdf?src-supplier=Element14, ComponentLink4Description=https://datasheet.ciiva.com/16855/pyu-rc0201-51-rohs-l-8-16855994.pdf?src-supplier=Avnet+Europe, ComponentLink4URL=https://datasheet.ciiva.com/16855/pyu-rc0201-51-rohs-l-8-16855994.pdf?src-supplier=Avnet+Europe, ComponentLink5Description=https://datasheet.ciiva.com/28419/pyu-rc0201-51-rohs-l-8-28419660.pdf?src-supplier=Avnet+Europe, ComponentLink5URL=https://datasheet.ciiva.com/28419/pyu-rc0201-51-rohs-l-8-28419660.pdf?src-supplier=Avnet+Europe, ComponentLink6Description=https://datasheet.ciiva.com/46391/1421516-46391340.pdf?src-supplier=Element14, ComponentLink6URL=https://datasheet.ciiva.com/46391/1421516-46391340.pdf?src-supplier=Element14, ComponentLink7Description=https://datasheet.ciiva.com/8896/pyu-rc0201-51-rohs-l-8-8896143.pdf?src-supplier=Avnet, ComponentLink7URL=https://datasheet.ciiva.com/8896/pyu-rc0201-51-rohs-l-8-8896143.pdf?src-supplier=Avnet, Construction=Rectangular, Contact Plating=Tin,Matte, Depth=0.3mm, Features="Moisture Resistant", Height=0.01inch, Lead Free="Lead Free", Length=0.6mm, Manufacturer Part Number=RC0201JR-070RL, Military Standard=Not, Number of Terminations=2, Packaging="Tape and Reel", Power Rating=50mW, Pricing 1="1=0.10000, 10=0.03600, 25=0.02640, 50=0.02000, 100=0.01480, 250=0.01128, 500=0.00904, 1000=0.00665, 5000=0.00477 (USD)", Radiation Hardening=No, REACH SVHC=Unknown, Resistance=0R, RoHS=Yes, RoHS Compliant=Yes, Series=RC, Size Code=0201, Stock 1=11079, Supplier 1=Digi-Key, Termination=SMD/SMT, Tolerance=5%, Voltage Rating (DC)=25V, Weight=6E-06oz, Width=0.012inch
R7 R8 R11: library part RC0201FR-074K7L, "RES 4.7K OHM 1% 1/20W 0201", LCSC Part Number=C138135, Manufacturer=Yageo, Supplier Part Number=7537285, Category="Chip SMD Resistors", ComponentLink1Description=https://datasheet.ciiva.com/2493/pyu-r-int-thick-7-2493811.pdf?src-supplier=Digi-Key, ComponentLink1URL=https://datasheet.ciiva.com/2493/pyu-r-int-thick-7-2493811.pdf?src-supplier=Digi-Key, ComponentLink2Description=https://datasheet.ciiva.com/2493/pyu-r-int-thick-7-2493812.pdf?src-supplier=Digi-Key, ComponentLink2URL=https://datasheet.ciiva.com/2493/pyu-r-int-thick-7-2493812.pdf?src-supplier=Digi-Key, ComponentLink3Description=https://datasheet.ciiva.com/2493/pyu-r-int-thick-7-2493813.pdf?src-supplier=Digi-Key, ComponentLink3URL=https://datasheet.ciiva.com/2493/pyu-r-int-thick-7-2493813.pdf?src-supplier=Digi-Key, ComponentLink4Description=https://datasheet.ciiva.com/8892/pyu-rc0201-51-rohs-l-8-8892942.pdf?src-supplier=Avnet, ComponentLink4URL=https://datasheet.ciiva.com/8892/pyu-rc0201-51-rohs-l-8-8892942.pdf?src-supplier=Avnet, ComponentLink5Description=https://datasheet.ciiva.com/7672/1563626-7672233.pdf?src-supplier=Element14, ComponentLink5URL=https://datasheet.ciiva.com/7672/1563626-7672233.pdf?src-supplier=Element14, Item Type=Resistor, Manufacturer Part Number=RC0201FR-074K7L, Pricing="10000=0.0014, 50000=0.0013, 250000=0.0013, 750000=0.0012, 2000000=0.0011 (USD)", RoHS=Yes, Stock=1610000, Supplier="Future Electronics"
SW1 SW2: "SWITCH TACTILE, SPST-NO, 0.05A 1", Manufacturer=Mitsumi, Supplier Part Number=2508-R-667799CT-ND, Category="Tactile Switches", Item Type="Tactile Switch", Manufacturer Part Number=R-667799, Pricing="1=0.32, 10=0.31, 25=0.2944, 100=0.2666, 250=0.24304, 500=0.2259, 1000=0.19271, 2500=0.18736 (USD)", RoHS=No, Stock=11526, Supplier=Digi-Key
U1: "QFN-40-EP(5x5) Microcontroller Units (MCUs/MPUs/SOCs) ROHS", JLCPCB Part Number=C3036461, Manufacturer="X-Powers Tech", Package=QFN-40-EP(5x5), Item Type=IC, Manufacturer Part Number=AXP2101
U2: "RF TXRX MODULE BT PCB TRACE SMD", LCSC Part Number=C2934569, Manufacturer="Espressif Systems", Package=SMD,13.2x16.6mm, Supplier Part Number=1965-ESP32-C3-MINI-1-H4CT-ND, Category=Uncategorized, ComponentLink1Description=LCSC, ComponentLink1URL=https://www.lcsc.com/product-detail/WiFi-Modules_Espressif-Systems-ESP32-C3-MINI-1-H4_C2934569.html, Item Type=Module, Manufacturer Part Number=ESP32-C3-MINI-1-H4, Pricing="1=1.9 (USD)", RoHS=No, Stock=35793, Supplier=Digi-Key
U3: "SENSOR OXIMETER/HEART RATE I2C", LCSC Part Number=C6454833, Manufacturer=Maxim, Max Operating Temperature=85°C, Min Operating Temperature=-40°C, Supplier Part Number=700-MAX30102EFD+T, Category=Sensors, ComponentLink1Description=https://datasheets.maximintegrated.com/en/ds/MAX30102.pdf?src-supplier=Digi-Key, ComponentLink1URL=https://datasheets.maximintegrated.com/en/ds/MAX30102.pdf?src-supplier=Digi-Key, Item Type="Heart Rate Sensor", Manufacturer Part Number=MAX30102EFD+T, Output Type=I2C, Packaging="Cut Tape", Pricing="1=12.43, 10=9.84, 50=9.32, 100=7.95, 1000=7.05, 10000=6.66 (USD)", RoHS=Yes, RoHS Compliant=Yes, Series=-, Stock=7965, Supplier=Mouser
U4: "WSON-6(2x2) Temperature Sensors ROHS", LCSC Part Number=C2871850, Manufacturer="Texas Instruments", Max Operating Temperature=150°C, Min Operating Temperature=-55°C, Package=WSON-6(2x2), Supplier Part Number=595-TMP117AIDRVT, Category="Integrated Circuits (ICs)", ComponentLink1Description=LCSC, ComponentLink2Description=http://www.ti.com/lit/ds/symlink/tmp117.pdf?src-supplier=Digi-Key, ComponentLink2URL=http://www.ti.com/lit/ds/symlink/tmp117.pdf?src-supplier=Digi-Key, ComponentLink3Description=http://www.ti.com/lit/gpn/tmp117?src-supplier=Digi-Key, ComponentLink3URL=http://www.ti.com/lit/gpn/tmp117?src-supplier=Digi-Key, Item Type="Temperature Sensor", Manufacturer Part Number=TMP117AIDRVT, Mounting Technology="Surface Mount", Output Type=I2C, Packaging="Cut Tape", Pricing="1=6.97, 10=5.24, 50=5.24, 100=4.61, 1000=4.02, 10000=4.02 (USD)", Resolution=16b, RoHS=Yes, RoHS Compliant=Yes, Series=-, Stock=14532, Supplier=Mouser
U5: "IC TRANSLTR BIDIRECTIONAL 8DSBGA", Case/Package=BGA, High Level Output Current=-20uA, LCSC Part Number=C353037, Low Level Output Current=1mA, Manufacturer="Texas Instruments", Max Operating Temperature=85°C, Max Supply Voltage=5.5V, Min Operating Temperature=-40°C, Min Supply Voltage=1.65V, Package Quantity=3000, Quiescent Current=14.4uA, Supplier Part Number=595-TXS0102YZPR, Category="Logic ICs", Channel Type=Bidirectional, ComponentLink1Description=https://datasheet.ciiva.com/22659/1719892-22659567.pdf?src-supplier=Element14, ComponentLink1URL=https://datasheet.ciiva.com/22659/1719892-22659567.pdf?src-supplier=Element14, ComponentLink2Description=https://datasheet.ciiva.com/1508/1828155-1508731.pdf?src-supplier=Element14, ComponentLink2URL=https://datasheet.ciiva.com/1508/1828155-1508731.pdf?src-supplier=Element14, ComponentLink3Description=https://datasheet.ciiva.com/15096/getdatasheetpartid-376613-15096286.pdf?src-supplier=Verical, ComponentLink3URL=https://datasheet.ciiva.com/15096/getdatasheetpartid-376613-15096286.pdf?src-supplier=Verical, ComponentLink4Description=https://datasheet.ciiva.com/1899/txs0102-1899401.pdf?src-supplier=Digi-Key, ComponentLink4URL=https://datasheet.ciiva.com/1899/txs0102-1899401.pdf?src-supplier=Digi-Key, ComponentLink5Description=https://datasheet.ciiva.com/1899/txs0102-1899402.pdf?src-supplier=Digi-Key, ComponentLink5URL=https://datasheet.ciiva.com/1899/txs0102-1899402.pdf?src-supplier=Digi-Key, ComponentLink6Description=https://datasheet.ciiva.com/1899/txs0102-1899403.pdf?src-supplier=Digi-Key, ComponentLink6URL=https://datasheet.ciiva.com/1899/txs0102-1899403.pdf?src-supplier=Digi-Key, ComponentLink7Description=https://datasheet.ciiva.com/14287/txs0102-14287925.pdf?src-supplier=Avnet, ComponentLink7URL=https://datasheet.ciiva.com/14287/txs0102-14287925.pdf?src-supplier=Avnet, ComponentLink8Description=https://datasheet.ciiva.com/48701/001073841-da-01-en-ic-volt-level-tr-txs0102yzpr-dsbga-8-tid-48701989.pdf?src-supplier=Conrad, ComponentLink8URL=https://datasheet.ciiva.com/48701/001073841-da-01-en-ic-volt-level-tr-txs0102yzpr-dsbga-8-tid-48701989.pdf?src-supplier=Conrad, Data Rate=24Mbps, Height=0.31mm, Item Type=IC, Lead Free="Lead Free", Length=1.92mm, Logic Function=Translator, Manufacturer Part Number=TXS0102YZPR, Mounting Technology="Surface Mount", Number of Bits=2, Number of Circuits=1, Number of Inputs=2, Output Current=1mA, Packaging="Tape and Reel", Pins=8, Pricing="1=0.7, 10=0.61, 50=0.61, 100=0.507, 1000=0.402, 10000=0.362 (USD)", Propagation Delay=260ns, Radiation Hardening=No, Reach SVHC Compliant=No, Rise Time=165ns, RoHS=Yes, RoHS Compliant=Yes, Series=-, Stock=48429, Supplier=Mouser, Turn-On Delay Time=102ns, Weight=8.1E-05oz, Width=0.918mm
U6: "IC LED DRV LIN SGL WR 30MA 6SSOT", Case/Package=SOT-23-6, Current Rating=30mA, JLCPCB=C890820, Manufacturer="ON Semiconductor / Fairchild", Max Operating Temperature=85°C, Max Output Voltage=5V, Max Supply Current=800uA, Max Supply Voltage=5.5V, Min Input Voltage=2.7V, Min Operating Temperature=-40°C, Package Quantity=1, Power Dissipation=132mW, Supplier Part Number=7396049P, Category="LED Drivers", ComponentLink1Description=https://datasheet.ciiva.com/1946/fan5622-1946946.pdf?src-supplier=Digi-Key, ComponentLink1URL=https://datasheet.ciiva.com/1946/fan5622-1946946.pdf?src-supplier=Digi-Key, ComponentLink2Description=https://datasheet.ciiva.com/1946/fan5622-1946947.pdf?src-supplier=Digi-Key, ComponentLink2URL=https://datasheet.ciiva.com/1946/fan5622-1946947.pdf?src-supplier=Digi-Key, ComponentLink3Description=https://datasheet.ciiva.com/1946/fan5622-1946948.pdf?src-supplier=Digi-Key, ComponentLink3URL=https://datasheet.ciiva.com/1946/fan5622-1946948.pdf?src-supplier=Digi-Key, ComponentLink4Description=https://datasheet.ciiva.com/3164/fan5624-3164252.pdf?src-supplier=Avnet, ComponentLink4URL=https://datasheet.ciiva.com/3164/fan5624-3164252.pdf?src-supplier=Avnet, Item Type=IC, Lead Free="Lead Free", Manufacturer Part Number=FAN5622SX, Min Supply Voltage=2.7V, Mounting Technology="Surface Mount", Number of Outputs=2, Number of Segments=6, Output Current=30mA, Packaging="Tape and Reel", Pins=23, Pricing="10=0.48, 100=0.288, 1000=0.218, 3000=0.212 (GBP)", Radiation Hardening=No, RoHS=Yes, RoHS Compliant=Yes, Series=-, Stock=2995, Supplier=Rs, Weight=0.03g

## Free pads (board coordinates)
  round 0 hole 17.72 mask+0: 3(3092,3059.05) NC(3092,2818.11) NC(3092,2858.27) NC(3092,2898.42) NC(3092,2938.58) NC(3092,2978.74) NC(3092,3018.9) NC(3092,3099.21) NC(3092,3139.37) NC(3092,3179.53)

## Via types
v1: diameter 9.84, hole 7.87, Top Layer to Bottom Layer, tented both sides, 89 vias

## Nets (pads, with @x,y where several pads share a name; then routed paths per layer and width w, separated by ;. In a path a pad name is that pad's centre, name@x,y a point inside that pad or via, vN(x,y) a via of type N, cw(c..) or ccw(c..) an arc to the next point about the centre after c; other vN are vias at no path point)
1V8: C20.2 C23.2 C24.2 P6.1 pad.NC@3092,3139.37 U1.18 U3.11 U5.A2 U5.D1 | length 1043
  Top Layer w6: v1(3762.19,3109.03) 3762.19,3094.97 3865,2992.15 v1(3865,2935)
  Bottom Layer w6: P6.1@2909,3143 P6.1@2912.63,3139.37 ; pad.NC@3092,3139.37 3114,3161.37 3114,3196.34 C24.2@3114,3216.19 ; 3117.51,3199.85 U1.18@3173.6,3199.85 ; C20.2@3400,2998 3400.85,2997.15 3440.61,2997.15 U3.11@3441.46,2996.3 3449.33,2996.3 3509,2936.63 3509,2879 3533,2855 3785,2855 v1(3865,2935) ; 3706.01,3211.68 3724.32,3211.68 3724.9,3212.27 3724.9,3219.13 3724.98,3219.21 3724.98,3228.51 v1@3725.7,3229.23 ; U5.D1@3743.98,3153.22 3743.98,3127.24 v1(3762.19,3109.03)
  other v1: 3727.62,3230.31
1V8_SCL: U3.2 U5.D2 | length 259.4
  Bottom Layer w6: U3.2@3535.94,3059.29 3647.13,3059.29 3670.84,3083 3706.48,3083 3724.32,3100.84 U5.D2@3724.32,3154.63
1V8_SDA: U3.3 U5.A1 | length 422
  Bottom Layer w6: U3.3@3535.94,3028 3709.44,3028 3784,3102.56 3784,3200 3770.32,3213.68 U5.A1@3744,3213.68
3V3: C6.2 C16.2 C17.2 C19.1 C21.1 C22.1 C25.2 C26.2 C27.2 D1.1 J3.1 J4.11 J4.12 J4.13 J4.14 J4.17 J4.23 J4.24 L1.2 P5.1 pad.NC@3092,2898.42 R5.2 R7.2 R8.2 R11.2 R13.2 R14.2 U1.21 U2.3 U3.9 U3.10 U4.5 U5.C2 U6.3 | length 2820.3
  Top Layer w6: C6.2@3161.01,3306.99 C6.2@3162,3306 3162,3302.5 C6.2@3168,3296.5 ; R14.2@3189.64,3296.5 3190,3296.14 R14.2@3190,3290 ; v1@3379,3372 v1(3380,3373) ; J4.23@3415.76,3373 J4.23@3416.76,3374 ; J4.17@3511.25,3374 3511.25,3358.75 3516,3354 3524.91,3354 3558.5,3320.41 J4.11@3558.5,3288.17 ; C27.2@3648.19,3370 C26.2@3648.19,3288 3667.19,3269 3685.19,3269 3692,3275.81 v1(3729.94,3275.81)
  Top Layer w10: J3.1@3018.7,2897.57 3091.15,2897.57 pad.NC@3092,2898.42 ; P5.1@3130,3355 3161.01,3323.99 C6.2@3161.01,3306.99 ; C6.2@3168,3296.5 R14.2@3189.64,3296.5 ; R7.2@3292,3279 R8.2@3292,3306 3292,3337 v1(3327,3372) ; v1(3475.28,2935) 3494.14,2953.86 3567.95,2953.86 3570,2951.81 ; v1@3570,2947.43 U2.3@3597.26,2947.43
  Top Layer w15: P5.1@3129,3356 3133.97,3356 3149.97,3372 v1(3327,3372)
  Top Layer w22: P5.1@3129,3356 P5.1@3134.29,3361.29
  Layer 2 w6: v1(3694,3139) 3694,3239.87 v1(3729.94,3275.81)
  Layer 2 w10: v1(3170,2883.56) 3221.44,2935 v1(3475.28,2935)
  Layer 2 w22: v1(3327,3372) v1@3379,3372
  Bottom Layer w6: L1.2@3163.44,3291 L1.2@3163.44,3313 ; L1.2@3166,3292 3166,3281.66 3165,3280.66 3171.66,3274 ; U1.21@3195,3250 U1.21@3195,3253.25 ; U1.21@3195.25,3253 U1.21@3195,3253.25 ; v1(3380,3373) v1(3575.86,3373) ; v1@3575.86,3372 3566,3362.14 3566,3280 3616,3230 3666,3230 3673,3223 3673,3203.19 C19.1@3656,3186.19 ; U4.5@3631.39,3186 3631.48,3186.09 3656.09,3186.09 C19.1@3657,3187 ; R5.2@3640.83,3082 3640.83,3097.83 3682,3139 v1(3694,3139) 3693.81,3139.19 3693.81,3151.81 C22.1@3693.62,3152 ; 3649,2999 3649,3005.89 3702.89,3005.89 3799.17,3102.17 3799.17,3223.86 U6.3@3745.02,3278.02 ; C22.1@3694,3150 3694,3162 3706.31,3174.31 U5.C2@3724.32,3174.31 ; U1.21@3195,3253.25 3193.92,3254.33 3193.92,3260.93 3195,3259.85 U1.21@3195,3253.25
  Bottom Layer w10: pad.NC@3092,2898.42 3157.33,2898.42 3169.76,2886 v1@3170,2886 ; v1(3170,2883.56) 3170,2850.72 3182.72,2838 D1.1@3185.45,2838 ; R11.2@3386.17,3059 3386.17,3032.33 3378,3024.16 3378,2956 3386,2948 3410,2948
  other v1: 3570,2944.81 3165,3278
3V3_LDO: C10.2 U1.20 | length 40.9
  Bottom Layer w6: C10.2@3139,3216.19 3154.16,3231.35 U1.20@3173.6,3231.35
AXP_3V3: C11.2 D1.2 L3.2 U1.4 | length 187
  Bottom Layer w8: C11.2@3263,2892 3263,3001 3289.74,3027.74 U1.4@3289.74,3067.96
AXP_INT: R4.1 U1.38 U2.18 | length 1317.3
  Top Layer w6: v1(3348.39,3330.29) 3365.2,3313.42 3373,3305.62 3373,3271.01 3364.98,3262.98 U2.18@3364.98,3234.83
  Layer 1 w6: v1(3315.38,2899.81) 3315.38,2947.38 3315.38,2962.38 3406,3053 3578,3053 3595,3070 3595,3113.62 3582.15,3126.47 3537.23,3126.47 v1(3536.53,3127.17)
  Layer 2 w6: v1(3348.39,3330.29) 3332.69,3346 3257,3346 3250.92,3339.92 3250.92,3267.81 3272.73,3246 3387.47,3246 3506.29,3127.17 v1(3536.53,3127.17)
  Bottom Layer w6: v1(3315.38,2899.81) 3317.19,2901.62 3317.19,2912.54 R4.1@3319,2914.35 ; U1.38@3363.64,3121.11 3507.76,3121.11 3513.14,3126.49 3535.84,3126.49 v1(3536.53,3127.17)
AXP_PS: C2.1 C3.2 C4.2 C7.2 C9.1 C14.2 L2.1 LED1.1 R4.2 U1.6 U1.7 U1.13 U1.17 U1.23 U1.24 U1.34 | length 1255.1
  Bottom Layer w6: C14.2@3129,3177.62 3135.48,3184.1 U1.17@3173.6,3184.1 ; C7.2@3130.06,3121.06 3132.06,3123.06 3140,3123.06 ; 3140,3121.06 3145,3121.06 ; 3145,3174 3145,3121.06 ; U1.13@3173.6,3121.11 3173.54,3121.06 3145,3121.06 ; v1(3222.95,3350.63) 3222.95,3333.06 3214.19,3324.3 C2.1@3214.19,3303 3214.19,3290.81 3226.75,3278.25 U1.23@3226.75,3253 U1.23@3226.97,3253.22 ; U1.7@3242.25,3067.71 U1.7@3242.5,3067.96 3242.5,3038.5 3237,3033 3213.81,3033 C9.1@3213,3033.81 3182.19,3033.81 3172,3044 v1(3172,3056) 3156,3056 3145,3067 3145,3121.06 ; U1.24@3242.42,3253.22 U1.24@3243.83,3262.72 ; U1.34@3358.64,3184.1 3392.74,3184.1 v1@3397.14,3188.5 ; v1@3396.62,3188.5 v1@3396.88,3188.5 ; v1(3397.66,3188.5) v1@3397.14,3188.5 ; v1@3397.69,3189.31 v1@3396.88,3188.5 ; v1@3398,3189 ccw(c3393.17,3193.83) 3399.4,3191.02 ccw(c3393.17,3193.83) 3400,3193.83 3400,3260 3422.12,3282.12 L2.1@3455,3282.12 ; v1@3396.88,3188.5 v1@3397.14,3188.5
  Bottom Layer w8: R4.2@3318.86,2937.14 LED1.1@3318.86,2965 ; R4.2@3319,2936 3296.69,2936 3292,2931.31 3292,2856 3310.16,2837.84 3647.16,2837.84 3699,2786 v1(3699,2743)
  other v1: 3173.54,3184.16
CSX: J4.9 U2.21 | length 364.4
  Top Layer w6: v1(3267,3286) 3267,3265.21 3270.49,3261.72 U2.21@3270.49,3234.83 ; v1(3513.05,3315.34) 3514.34,3315.34 3527,3302.68 J4.9@3527,3288.17
  Layer 2 w6: v1(3267,3286) 3291,3262 3459.71,3262 v1(3513.05,3315.34)
CTP_INT: J4.21 U2.6 | length 529.5
  Top Layer w6: v1(3427.32,3345.95) ccw(c3427.32,3361.96) 3438.64,3350.64 3442.18,3354.18 3443,3355 ccw(c3430.3,3367.7) 3448.26,3367.7 J4.21@3448.26,3374 J4.21@3446.73,3372.47 ; U2.6@3597.26,3041.91 3614.91,3041.91 3623,3050 3623,3195 3632.04,3204.04 v1(3632.04,3248.81)
  Layer 2 w6: v1(3427.32,3345.95) 3441.25,3359.88 3520.97,3359.88 v1(3632.04,3248.81)
CTP_RST: C18.2 J3.6 J4.10 J4.18 pad.NC@3092,3099.21 R5.1 U2.8 | length 1088.5
  Top Layer w6: J4.18@3495.5,3374 3495.5,3349.5 3504,3341 3519.52,3341 3542.75,3317.77 J4.10@3542.75,3288.17 3542.75,3268.25 3548,3263 3565,3263 3571,3257 3571,3100.76
  Top Layer w8: v1(2959,3099) 2967,3099 2971.57,3094.43 J3.6@3018.7,3094.43 ; v1(3569.52,3095.78) 3579.48,3105.74 3596.43,3105.74 U2.8@3597.26,3104.91
  Layer 1 w8: v1@2959,3099.21 pad.NC@3092,3099.21 3111.86,3119.07 3486.93,3119.07 3510.22,3095.78 v1(3569.52,3095.78)
  Bottom Layer w8: v1(3569.52,3095.78) 3579.66,3085.63 3591.56,3085.63 3596,3081.19 3596,3080 3605,3080
DISPLAY_BLK: R9.1 R14.1 U6.1 | length 1066.1
  Top Layer w6: v1(3193.94,3351.08) 3193.94,3326.06 3201.25,3318.75 R9.1@3213.25,3318.75 R14.1@3213.25,3289
  Layer 1 w6: v1(3193.94,3351.08) 3193.94,3301.06 3245,3250 3543.5,3250 3572.5,3221 3672,3221 3705,3254 3764,3254 3782,3236 3815,3236 3834,3255 v1(3834,3308)
  Bottom Layer w6: U6.1@3716.18,3358.4 U6.1@3728.18,3358.4 3755.4,3358.4 3773,3376 3818,3376 3834,3360 v1(3834,3308)